# Altium PCB PCB_Cyborg greenC_Debug.PcbDoc
Units mm, origin at the board's own origin, x right, y up, seen from the top; angles counter-clockwise.
Board outline 32 x 18 mm, 2 copper layers (Top Layer, Bottom Layer); 18 components, 17 nets, 78 pads, 37 vias.
Unrouted connection lines stored in the file: 28.
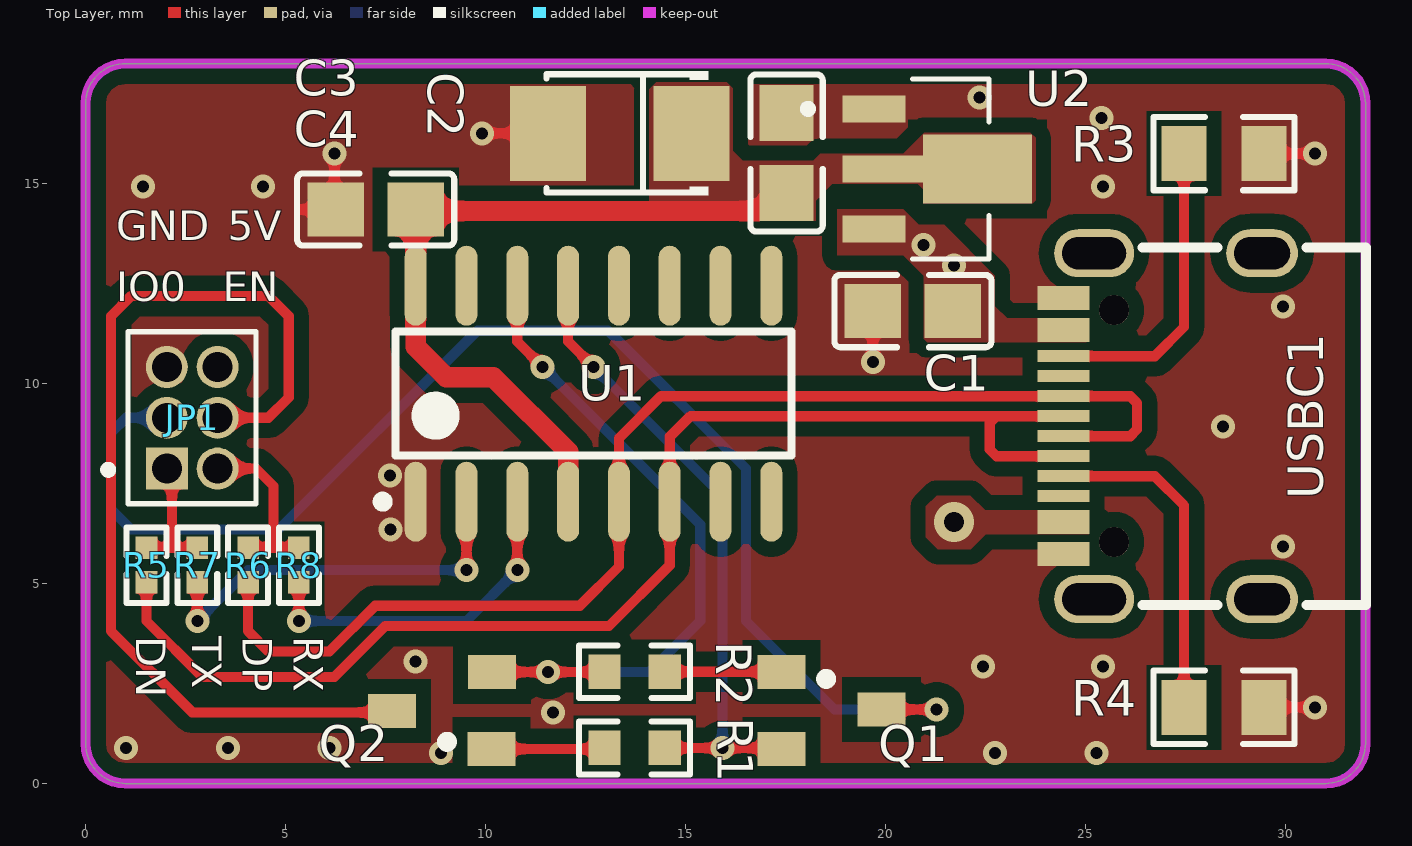
[diagram p0: Top Layer view]
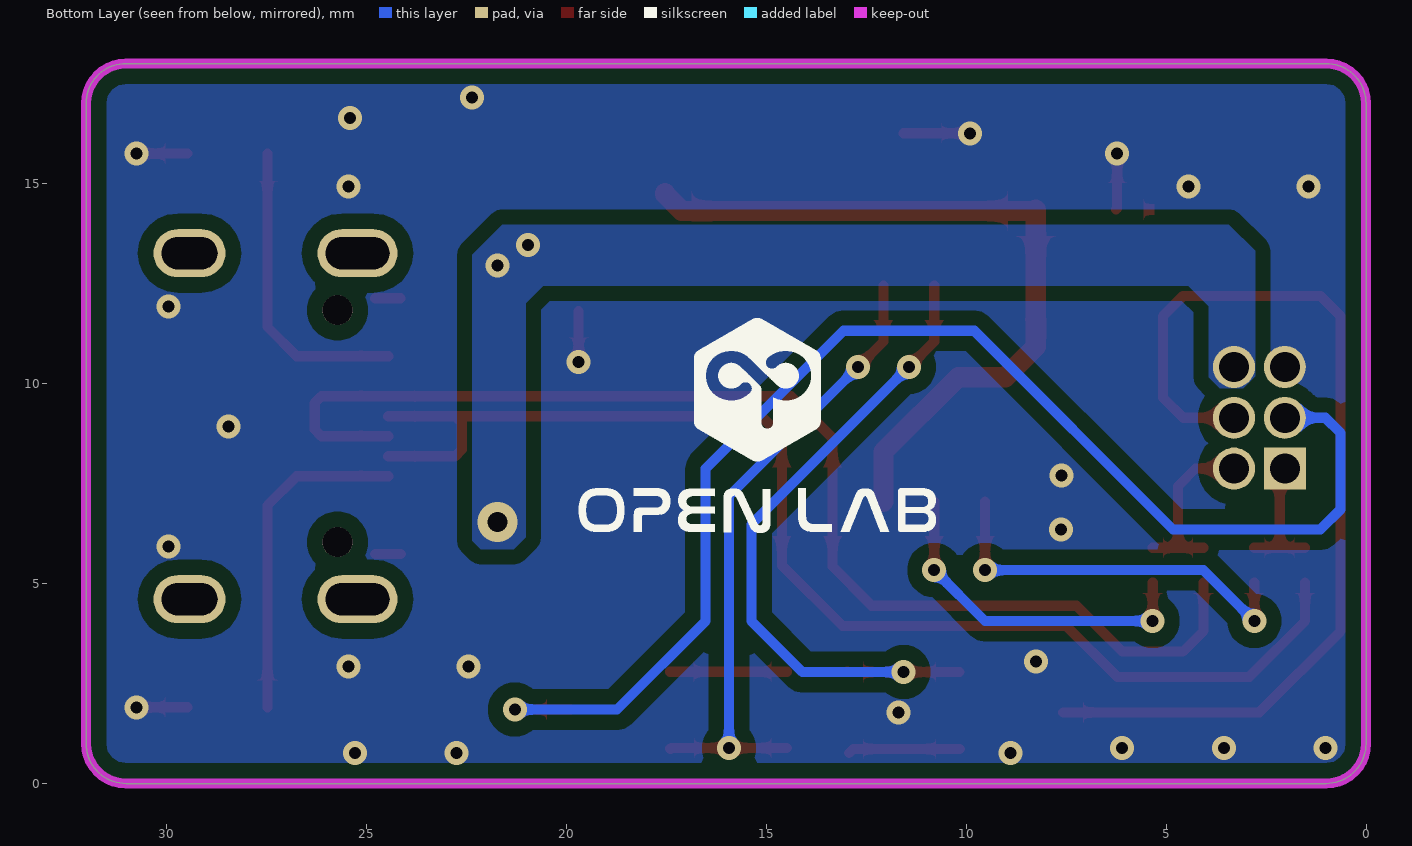
[diagram p1: Bottom Layer view, seen from below]
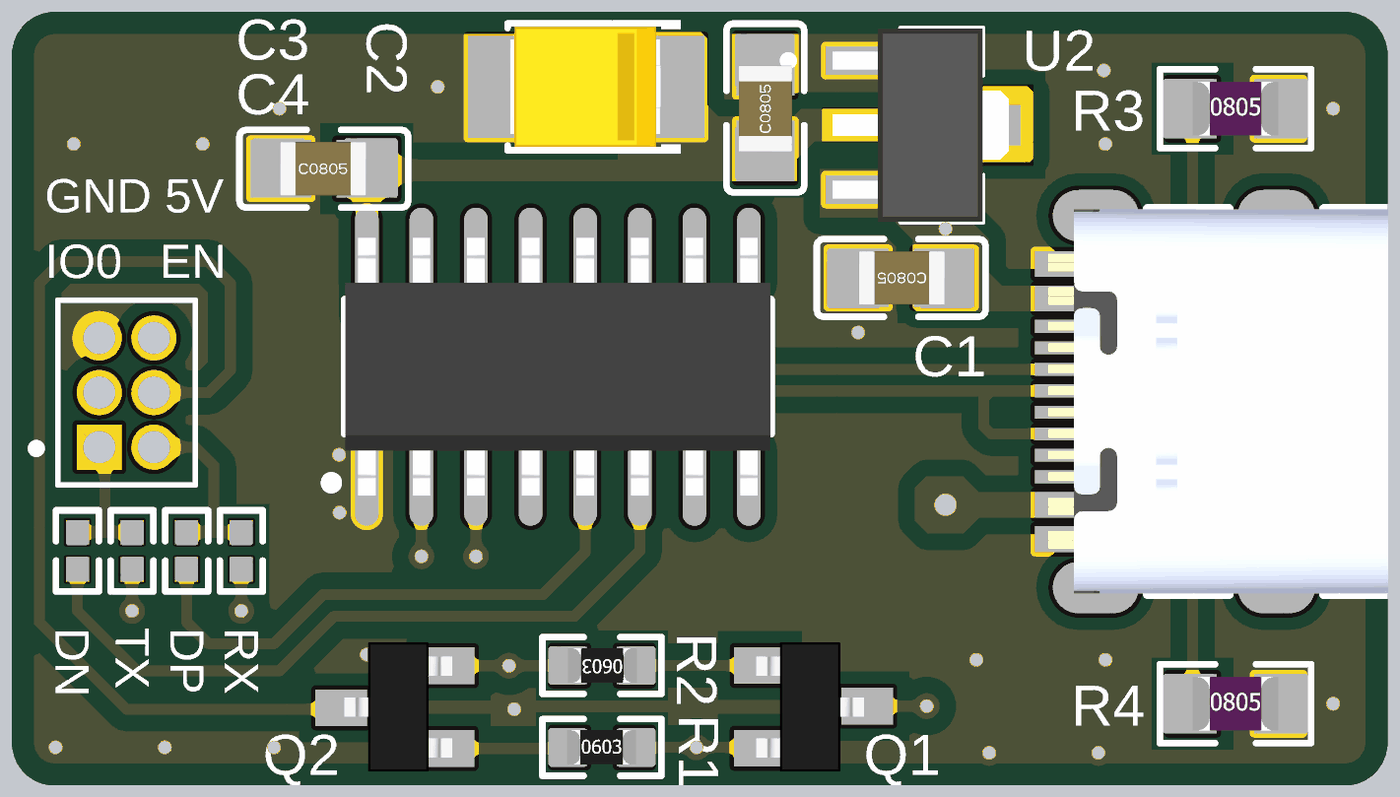
[diagram p2: 3D render of the assembled board from above, using the file's embedded part models]

## Layer stack, top to bottom
Top Solder: solder mask 0.0102, Solder Resist, Dk 3.5
Top Layer: signal copper 0.0356
Dielectric 1: dielectric 0.32, FR-4, Dk 4.8
Bottom Layer: signal copper 0.0356
Bottom Solder: solder mask 0.0102, Solder Resist, Dk 3.5

## Board outline
0,1 0,17 cw(c1,17) 1,18 31,18 cw(c31,17) 32,17 32,1 cw(c31,1) 31,0 1,0 cw(c1,1)

## Design rules (kind name [scope] priority, off if disabled: settings)
Clearance Clear_GND [InNamedPolygon('GND_L01_P020') Or InNamedPolygon('GND_L02_P021')] p1: gap=0.381 ignorepadtopadclearanceinfootprint=FALSE
Clearance [All] p2: gap=0.178 ignorepadtopadclearanceinfootprint=FALSE
PolygonConnect [All] p1: connectstyle=Direct reliefconductorwidth=0.254 reliefentries=4 polygonreliefangle="90 Angle" airgapwidth=0.254
RoutingVias [All] p1: holewidth=0.3 width=0.6 viastyle="Through Hole" minholewidth=0.3 minwidth=0.6 maxholewidth=0.5 maxwidth=1.1
SolderMaskExpansion [All] p1: expansion=0.102 istentingtop=FALSE
Width [All] p1: maxlimit=0.635 minlimit=0.254 preferedwidth=0.508 minimp=50.000000 maximp=50.000000 favimp=50.000000
30 further rules are at their usual default settings.

## Components (designator, comment, footprint, x,y, rotation, side; value= is the part's Value field where it differs from the comment)
C1 "100nF" "CAP CERAMIC SMD 0805 TyPE 2012" 20.701,11.811 r180 top
C2 "100nF" "CAP CERAMIC SMD 0805 TyPE 2012" 17.526,15.748 r90 top
C3 "100uF" "CAP TANTALUM SMD 3528-21 type B" 13.081,16.256 r180 top
C4 "100nF" "CAP CERAMIC SMD 0805 TyPE 2012" 7.239,14.351 r0 top
JP1 "JP 2x3 1.27 Cai cong" "JP 2X3 CT 1.27" 2.667,9.144 r270 top
Q1 "S8050" SOT-23 17.317,0.838 r270 top
Q2 "S8050" SOT-23 10.236,2.819 r90 top
R1 "10K" "Res CHIPS SMD 0603 TYPE 1608" 13.734,0.889 r0 top
R2 "10K" "Res CHIPS SMD 0603 TYPE 1608" 13.716,2.794 r180 top
R3 "5.1K" "RES CHIPS SMD 0805 TYPE 2012" 28.448,15.748 r0 top
R4 "5.1K" "RES CHIPS SMD 0805 TYPE 2012" 28.448,1.905 r0 top
R5 "NC" R0402 1.524,5.461 r90 top
R6 "NC" R0402 4.064,5.461 r90 top
R7 "NC" R0402 2.794,5.461 r90 top
R8 "NC" R0402 5.334,5.461 r90 top
U1 "CH340G" SOP-16 17.145,12.446 r90 top
U2 "AMS1117-3.3V" SOT-89 19.939,20.955 r270 top
USBC1 "TYPE-C" "CONNECTORS SMD USB TYPE C 16P" 28.067,9.017 r90 top

## Footprints (in the part's own frame and the unit in brackets; to place one, negate y for a bottom-side part, rotate by r counter-clockwise, add the part's x,y. Pads: shape width x height; smd on the part's side, far side on the other; paste and mask are expansions set on the pad)
"CAP CERAMIC SMD 0805 TyPE 2012" [mm]
  rect 1.41x1.35 smd: 1(-0.984,0) 2(1.016,0)
  silkscreen extent -1.95,-0.9 1.98,0.9, body extent -1,-0.62 1,0.63, height 0.6
"CAP TANTALUM SMD 3528-21 type B" [mm]
  rect 1.9x2.376 smd: 1(-2.073,0) 2(1.524,0)
  silkscreen extent -2.48,-1.55 1.55,1.55, body extent -2,-1.4 1.5,1.4, height 1.91
"CONNECTORS SMD USB TYPE C 16P" [mm]
  oval 1.2x2 hole 0.8 slot 1.6 at 90 deg: 0(-4.408,2.854) 1(4.242,2.854)
  oval 1.2x1.8 hole 0.8 slot 1.4 at 90 deg: 2(4.242,-1.346) 3(-4.408,-1.346)
  rect 0.3x1.3 smd: A1(-3.433,3.622) A4(-2.633,3.622) A5(-1.333,3.622) A6(-0.333,3.622) A7(0.167,3.622) A8(1.167,3.622) A9(2.467,3.622) A12(3.267,3.622) B1(2.967,3.622) B4(2.167,3.622) B5(1.667,3.622) B6(0.667,3.622) B7(-0.833,3.622) B8(-1.833,3.622) B9(-2.333,3.622) B12(-3.133,3.622)
  round 0.75 hole 0.75 unplated: ""(-2.983,2.354) ""(2.817,2.354)
  silkscreen extent -4.55,-3.95 4.39,1.64, body extent -4.55,-3.95 4.39,3.96, height 3.31
"JP 2X3 CT 1.27" [mm]
  rect 1.05x1.05 / inner round 1.05 / far side rect 1.05x1.05 hole 0.75: 1(1.27,-0.635)
  round 1.05 hole 0.75: 2(1.27,0.635) 3(0,-0.635) 4(0,0.635) 5(-1.27,-0.635) 6(-1.27,0.635)
  silkscreen extent -2.15,-2.2 2.15,1.6
R0402 [mm]
  rect 0.566x0.54 smd paste-100 mask+0.051: 1(-0.433,0) 2(0.433,0)
  silkscreen extent -0.94,-0.5 0.94,0.5
"Res CHIPS SMD 0603 TYPE 1608" [mil]
  rect 31.75x34.02 smd: 1(-30,0) 2(29.31,0)
  silkscreen extent -55,-26 54,26, body extent -32,-16 31,16, height 17
"RES CHIPS SMD 0805 TYPE 2012" [mil]
  rect 44.59x54.21 smd: 1(-38.74,0) 2(40,0)
  silkscreen extent -69,-36 70,36, body extent -39,-25 40,25, height 24
SOP-16 [mm]
  oval 2x0.55 smd: 1(-5.4,8.89) 2(-5.4,7.62) 3(-5.4,6.35) 4(-5.4,5.08) 5(-5.4,3.81) 6(-5.4,2.54) 7(-5.4,1.27) 8(-5.4,0) 9(0,0) 10(0,1.27) 11(0,2.54) 12(0,3.81) 13(0,5.08) 14(0,6.35) 15(0,7.62) 16(0,8.89)
  silkscreen extent -5.52,-0.51 -1.15,9.84, body extent -5.7,-0.5 0.3,9.4, height 1.4
SOT-23 [mm]
  rect 0.85x1.2 smd: 1(-1.956,0.082) 2(-0.031,0.076) 3(-1.011,2.576)
  silkscreen extent -1.9,1.07 -1.65,1.32, body extent -2.49,0 0.51,2.5, height 1.06
SOT-89 [mil]
  rect 26.46x62.01 smd: 1(161,-9) 3(279.11,-9)
  rect 68x107 smd paste-39.37 mask+0: 2(220,93)
  rect 26.46x80 smd paste-39.37 mask+0: 2(220,0)
  silkscreen extent 131,-78 309,104, body extent 131,-33 309,128, height 63

## Part data
C1 C2 C4: library part "CAP 0805 50V 10%", "0805 Multilayer Ceramic Capacitors MLCC - SMD/SMT ROHS"
C3: library part "CAP ALU HOLD", "Aluminum Electrolytic Capacitors - Leaded ROHS", BOM_JLCPCB Part Class="Extended Part", BOM_Manufacturer=AISHI(艾华集团), BOM_Manufacturer Part=ERR1VM102G20OT, BOM_Supplier=LCSC, BOM_Supplier Part=C398835, Contributor=LCSC, nameAlias=Capacitance, spicePre=C, spiceSymbolName=ERR1VM102G20OT
JP1: library part "JP 2x3 1.27 Cai Thang"
Q1 Q2: library part "TRANSISTOR SMD NPN", "SOT-23 Bipolar Transistors npn - BJT ROHS", BOM_Manufacturer=晶扬电子, BOM_Manufacturer Part=MMBT3904, BOM_Supplier=LCSC, BOM_Supplier Part=C5156716, Contributor=lcsc, link=https://atta.szlcsc.com/upload/public/pdf/source/20220916/F7F78DEEB551E1B14C8EDDE9CBB3CED9.pdf, spicePre=Q, spiceSymbolName=MMBT3904_C5156716
R1 R2 R3 R4: library part "RES 0805 1%", "±1% - Chip Resistor - Surface Mount ROHS", Chung_Loai=Dán, Don_Vi=Con, Ma_Hang=MH005880, So_Chan=2
R5 R6 R7 R8: library part "RES 0402", "RES SMD 0402", Manufacturer="Vishay Dale", Manufacturer Part Number=CRCW040210K0FKED, Operating Temperature="-55°C ~ 155°C", Package / Case="0402 (1005 Metric)", Power (Watts)="0.063W, 1/16W", Resistance (Ohms)=10k, Supplier Part Number 1=541-10.0KLCT-ND, Temperature Coefficient=±100ppm/°C, Tolerance=±1%, Category=Resistors, ComponentLink1Description=http://www.vishay.com/docs/20035/dcrcwe3.pdf, ComponentLink1URL=http://www.vishay.com/docs/20035/dcrcwe3.pdf, Composition="Thick Film", Features="Automotive AEC-Q200", Height="0.016\" (0.40mm)", Number of Terminations=2, Packaging="Cut Tape (CT)", Pricing 1="10=0.083, 50=0.0444, 200=0.0255, 1000=0.0174 (USD)", RoHS="RoHS Compliant", Size / Dimension="0.039\" L x 0.020\" W (1.00mm x 0.50mm)", Stock 1=2392462, Supplier 1=Digi-Key, Supplier Device Package="0402 (1005 Metric)"
U1: library part IC_CH340G, "Transceiver 2Mbps USB 2.0 SOP-16-150mil USB ICs ROHS", ComponentLink1Description="Manufacturer Link", ComponentLink1URL=http://www.irf.com/, ComponentLink2Description=Datasheet, ComponentLink2URL=http://www.irf.com/product-info/datasheets/data/ir2110.pdf, DatasheetVersion=PD60147J, LatestRevisionDate=04-Mar-2005, LatestRevisionNote="Stylized 3D Model Added.", Note="Pins 4, 8 and 14 are not connected", PackageDescription="DIP; 14 Leads; Row Spacing 7.62 mm; Pitch 2.54 mm", PackageReference=PDIP14, Published=8-Jun-2000, Publisher="Altium Limited"
U2: library part "POWER CONVERTERS AMS117-3V3 - SOT-89", JLCPCB Part Class="Extended Part", Manufacturer=Slkor(萨科微), Manufacturer Part=AMS1117-1.8, Contributor=LCSC, spicePre=U, spiceSymbolName=AMS1117-1.8_C880751, Supplier=LCSC, Supplier Part=C880751
USBC1: library part "CONNECTORS TYPE-C-31-M-12", "5A 1 16 Female Type-C SMD USB Connectors ROHS", BOM_JLCPCB Part Class="Extended Part", BOM_Manufacturer=韩国韩荣, BOM_Manufacturer Part=TYPE-C-31-M-12, BOM_Supplier=LCSC, BOM_Supplier Part=C165948, Contributor=LCSC, spicePre=U, spiceSymbolName=TYPE-C-31-M-12, Supplier 1=Farnell

## Via types
v1: diameter 0.6, hole 0.3, Top Layer to Bottom Layer, tented both sides, 36 vias
v2: diameter 1, hole 0.5, Top Layer to Bottom Layer, tented both sides, 1 vias

## Nets (pads, with @x,y where several pads share a name; then routed paths per layer and width w, separated by ;. In a path a pad name is that pad's centre, name@x,y a point inside that pad or via, vN(x,y) a via of type N, cw(c..) or ccw(c..) an arc to the next point about the centre after c; other vN are vias at no path point)
3V3DC: C2.1 C3.1 C4.2 U1.4 U1.16 U2.2 | length 19.1
  Top Layer w0.508: U1.4 12.065,8.292 10.197,10.16 9.017,10.16 8.255,10.922 U1.16 C4.2 8.292,14.314 17.105,14.314 17.526,14.735 C2.1
CC1: R4.1 USBC1.A5 | length 8.4
  Top Layer w0.254: USBC1.A5 26.733,7.684 27.464,6.953 R4.1
CC2: R3.1 USBC1.B5 | length 7.7
  Top Layer w0.254: USBC1.B5 26.733,10.684 27.464,11.415 R3.1
DN: R5.1 U1.6 USBC1.A7 USBC1.B7 | length 31.9
  Top Layer w0.254: R5.1 1.524,4.064 2.921,2.667 6.223,2.667 7.493,3.937 13.086,3.937 14.605,5.456 U1.6 14.605,8.668 15.121,9.184 22.773,9.184 ; USBC1.B7 22.773,8.184 22.606,8.351 22.606,9.017 22.773,9.184 ; USBC1.A7 22.773,9.184
DP: R6.1 U1.5 USBC1.A6 USBC1.B6 | length 30.8
  Top Layer w0.254: R6.1 4.064,3.81 4.572,3.302 6.096,3.302 7.239,4.445 12.356,4.445 13.335,5.424 U1.5 13.335,8.636 14.383,9.684 USBC1.B6 26.117,9.684 26.284,9.517 26.284,8.851 26.117,8.684 USBC1.A6
DTR: Q1.2 R1.2 U1.13 | length 16.1
  Top Layer w0.254: U1.13 12.065,11.049 v1(12.7,10.414) ; R1.2 17.373,0.889 Q1.2
  Bottom Layer w0.254: v1(12.7,10.414) 15.926,7.188 v1(15.926,0.889)
EN: JP1.4 Q2.3 | length 24.5
  Top Layer w0.254: JP1.4 4.572,9.144 5.08,9.652 5.08,11.684 4.572,12.192 1.143,12.192 0.635,11.684 0.635,3.81 2.667,1.778 Q2.3@7.58,1.778
GND: C1.2 C2.2 C3.2 C4.1 JP1.5 R3.2 R4.2 U1.1 U2.1 USBC1.A1 USBC1.A12 USBC1.B1 USBC1.B12 | length 8.3
  Top Layer w0.254: v1(6.223,15.748) 6.223,14.383 C4.1 ; v1(9.906,16.256) C3.2 ; v1(19.685,10.541) C1.2 ; USBC1.B12@24.134,5.737 USBC1.B12@24.769,5.737 ; 24.141,12.134 24.776,12.134 ; R4.2 v1(30.734,1.905) ; R3.2 v1(30.734,15.748)
  Bottom Layer w0.635: JP1.5 JP1.5@2.111,10.493
  other v1: 8.89,0.762 22.733,0.762 25.273,0.762 1.016,0.889 3.556,0.889 6.096,0.889 11.684,1.778 22.436,2.926 25.436,2.926 8.255,3.048 29.936,5.926 7.62,6.35 7.61,7.696 28.436,8.926 29.936,11.926 1.436,14.926 4.436,14.926 25.436,14.926 25.4,16.637 22.352,17.145
GPIO0: JP1.3 Q1.3 | length 33.9
  Top Layer w0.254: Q1.3 v1(21.28,1.849)
  Bottom Layer w0.254: JP1.3 1.016,9.144 0.635,8.763 0.635,6.858 1.143,6.35 4.826,6.35 9.795,11.319 13.065,11.319 16.51,7.874 16.51,4.064 18.725,1.849 v1(21.28,1.849)
NetJP1_1: JP1.1 R5.2 R7.2 | length 3.3
  Top Layer w0.254: R5.2 2.159,5.894 ; JP1.1 2.159,7.747 2.159,5.894 ; R7.2 2.159,5.894
NetJP1_2: JP1.2 R6.2 R8.2 | length 4.4
  Top Layer w0.254: JP1.2 4.263,7.874 4.699,7.438 4.699,5.894 ; R6.2 4.699,5.894 ; R8.2 4.699,5.894
NetQ1_1: Q1.1 R2.1 | length 2.9
  Top Layer w0.254: R2.1 Q1.1
NetQ2_1: Q2.1 R1.1 | length 2.8
  Top Layer w0.254: Q2.1 12.82,0.864 R1.1@12.922,0.762
RTS: Q2.2 R2.2 U1.14 | length 17.4
  Top Layer w0.254: Q2.2 v1(11.563,2.789) 12.966,2.789 R2.2 ; U1.14 10.795,11.049 v1(11.43,10.414)
  Bottom Layer w0.254: v1(11.43,10.414) 15.367,6.477 15.367,4.064 14.092,2.789 v1(11.563,2.789)
U0RX: R8.1 U1.3 | length 8.7
  Top Layer w0.254: v1(5.334,4.064) R8.1 ; v1(10.795,5.334) U1.3
  Bottom Layer w0.254: v1(5.334,4.064) 9.525,4.064 v1(10.795,5.334)
U0TX: R7.1 U1.2 | length 9.9
  Top Layer w0.254: v1(2.794,4.064) R7.1 ; v1(9.525,5.334) U1.2
  Bottom Layer w0.254: v1(2.794,4.064) 4.064,5.334 v1(9.525,5.334)
VBUS: C1.1 JP1.6 U2.3 USBC1.A4 USBC1.A9 USBC1.B4 USBC1.B9
  other v1: 21.717,12.954 20.955,13.462
  other v2: 21.718,6.533
pads on no net: U1.7 U1.8 U1.9 U1.10 U1.11 U1.12 U1.15 USBC1. USBC1.0 USBC1.1 USBC1.2 USBC1.3 USBC1.A8 USBC1.B8

## Polygon pours and split planes (outlines as drawn)
GND on Top Layer "GND_L01_P020" (solid, remove dead copper, pour order 20): 0,18.034 32.004,18.034 32.004,0 0,0
VBUS on Top Layer "VBUS_L01_P019" (solid, remove dead copper, pour order 19): 25.019,11.633 23.038,11.633 22.733,11.938 22.733,12.7 21.463,13.97 20.828,13.97 20.447,14.351 18.796,14.351 18.796,13.208 20.447,13.208 20.955,12.7 20.955,11.034 25.019,11.034
3V3DC on Top Layer "3V3DC_L01_P016" (solid, remove dead copper, pour order 16): 20.943,14.855 20.807,14.99 20.062,14.99 18.673,14.99 18.258,14.575 18.258,14.067 14.189,14.067 14.097,14.159 14.097,17.354 14.269,17.526 16.032,17.526 16.181,17.377 16.181,15.823 16.432,15.572 18.195,15.572 18.37,15.748 20.447,15.748 20.968,16.269 23.624,16.269 23.753,16.14 23.753,14.99 23.753,14.578 23.678,14.504 20.943,14.504
VBUS on Top Layer "VBUS_L01_P017" (solid, remove dead copper, pour order 17): 25.081,6.834 22.487,6.834 22.123,7.198 21.278,7.198 21.006,6.926 21.006,6.156 21.3,5.863 22.134,5.863 22.506,6.234 25.079,6.234
GND on Bottom Layer "GND_L02_P021" (solid, remove dead copper, pour order 21): 0,18.034 32.004,18.034 32.004,0 0,0
VBUS on Bottom Layer "VBUS_L02_P018" (solid, remove dead copper, pour order 18): 4.445,12.445 3.937,11.937 3.937,10.16 3.662,9.885 3.069,9.885 2.775,10.179 2.775,13.316 3.429,13.97 21.59,13.97 22.346,13.214 22.346,6.074 22.133,5.861 21.307,5.861 21.007,6.162 21.007,12.006 20.568,12.445

## Keep-outs
Keep-Out Layer:
  the board outline again, w0.254

## Silkscreen, mask and mechanical layers (free items; w line width, h text height)
Top Overlay:
  text "GND" at 0.762,13.335 h1.27
  text "5V" at 3.556,13.335 h1.27
  text "IO0" at 0.762,11.811 h1.27
  text "EN" at 3.429,11.811 h1.27
  text "DN" at 1.016,3.683 h1.27 r270
  text "TX" at 2.413,3.683 h1.27 r270
  text "DP" at 3.683,3.683 h1.27 r270
  text "RX" at 4.953,3.683 h1.27 r270
Bottom Overlay:
  drawing of 8 lines, arcs and shapes, not listed